# Altium PCB CM5IO_V2.PcbDoc (part 2 of 4)
Units mm, origin at the board's own origin, x right, y up, seen from the top; angles counter-clockwise.
Board outline 160 x 90 mm, 4 copper layers (F.Cu, In1.Cu, In2.Cu, B.Cu); 77 components, 161 nets, 674 pads, 703 vias.
Unrouted connection lines stored in the file: 47.
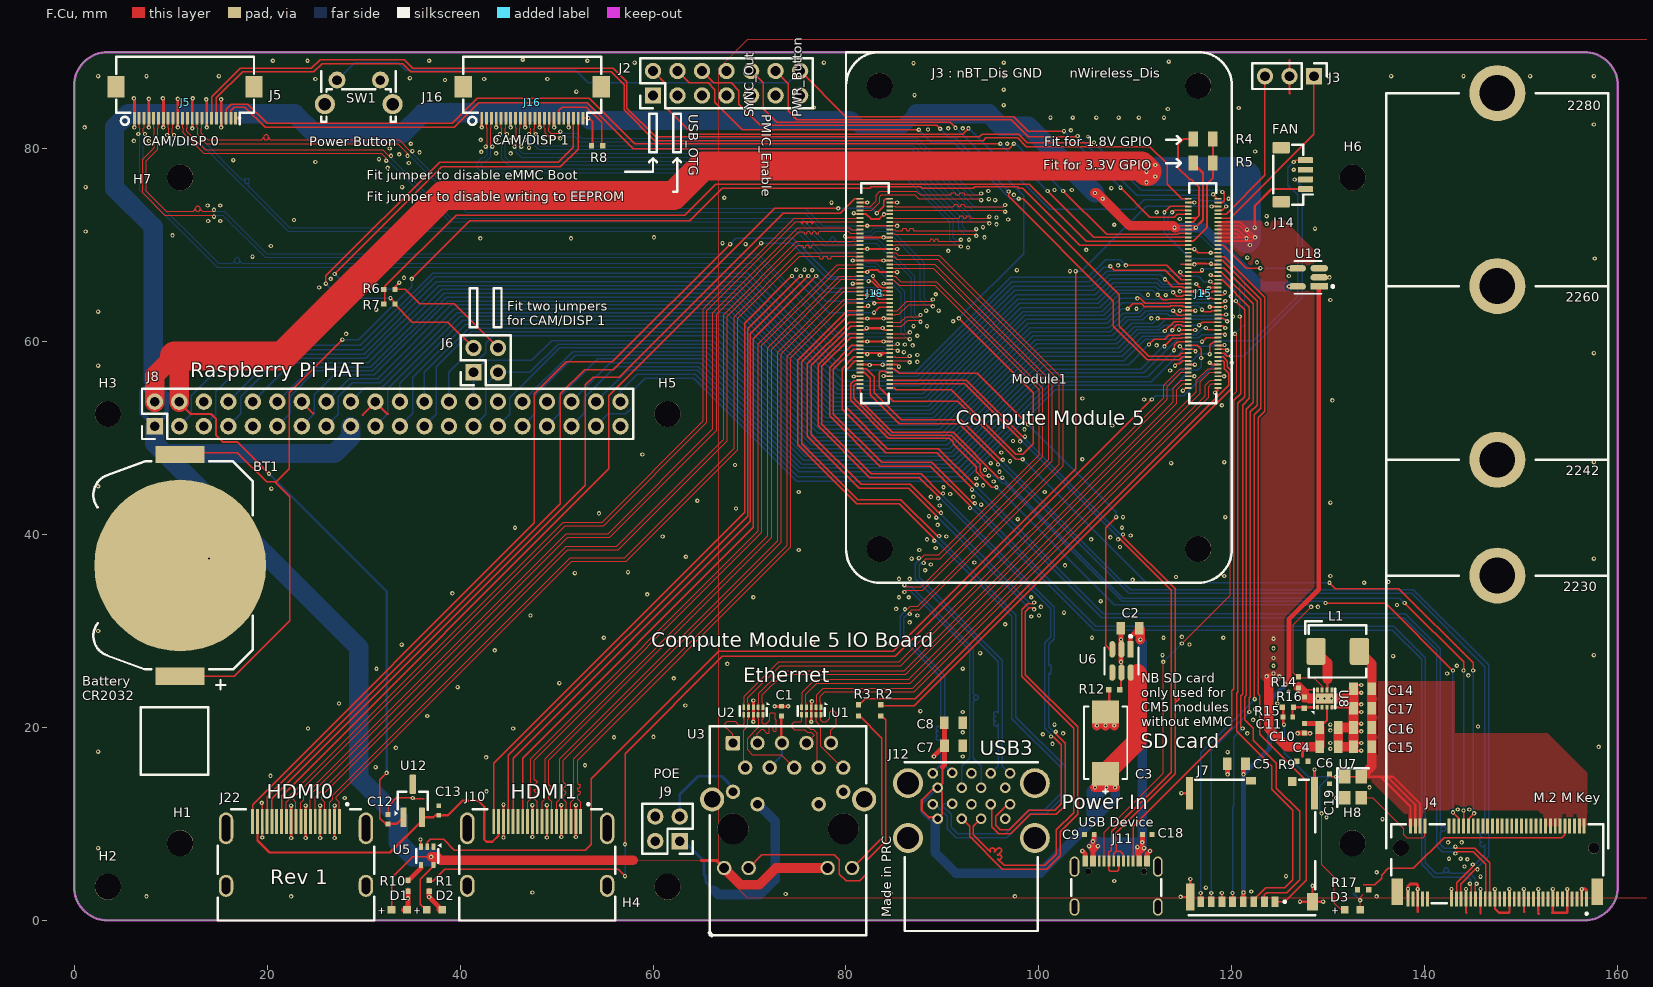
[diagram p0: F.Cu view]

## Part data (continued)
U1 U2: library part CMP-02720-1, "TEXAS INSTRUMENTS         TPD4EUSB30DQAR             ESD Protection Device, Array, 8 V, SON, 10 Pins", Breakdown Voltage=7V, Capacitance=0.8pF, Clamping Voltage=8V, Current Rating=5A, Max Operating Temperature=85°C, Min Operating Temperature=-40°C, Package Quantity=1, Peak Pulse Current=1A, Peak Pulse Power=45W, Power Line Protection=Yes, Reverse Standoff Voltage=5.5V, Data Rate=6Gbps, Depth=1mm, Direction=Unidirectional, ES P/N=0086-0901-1, ESD Protection=Yes, Height=0.5mm, Interface=USB, Lead Free="Lead Free", Length=2.5mm, Min Breakdown Voltage=8V, Number of Bidirectional Channels=4, Number Of Channels=4, Number of Pins=10, Packaging="Tape and Reel", Radiation Hardening=No, REACH SVHC="No SVHC", RoHS Compliant=Yes, SM P/N=6949-44043002, Termination=SMD/SMT, Width=1.1mm, Working Voltage=5.5V
U3: library part CMP-002-00168-2, "TRJG0926HENL Single Port Ethernet(PoE+) RJ45 Female Connector with 10/100/1000 Base-T Integrated Magnetics, Green/Yellow LED, Tab Down, RoHS", ComponentLink1Description=https://www.l-p.com/sale-432379-link-pp-lpjg0926henl-cross-a70-112-331n126-edac.htm, ComponentLink1URL=https://www.l-p.com/upload/file/2019/11-26/002050785.pdf, ComponentLink2Description=TRXCOM, ComponentLink2URL=https://p.globalsources.com/IMAGES/PDT/SPEC/690/K1160305690.pdf, EDAC P/N=A70-112-331N126, TE P/N=5-2337992-8
U5: library part CMP-633-000142-2, "74LVC Series 5.5 V Surface Mount Single Buffer with Open Drain Output - SOT-353", Case/Package=SOT-353, Low Level Output Current=32mA, Max Operating Temperature=85°C, Max Supply Voltage=5.5V, Min Operating Temperature=-40°C, Min Supply Voltage=1.65V, Operating Supply Current=10uA, Package Quantity=3000, Quiescent Current=200uA, Height=1mm, Lead Free="Lead Free", Length=2.2mm, Logic Function=Buffer,Inverting, Mounting Technology="Surface Mount", Number of Bits per Element=1, Number Of Channels=1, Number of Elements=1, Number of Gates=1, Number of Input Lines=1, Number Of Inputs=1, Number of Output Lines=1, Number Of Outputs=1, Packaging="Tape and Reel", Pins=5, Polarity=Inverting,Non-Inverting, Propagation Delay=3ns, Radiation Hardening=No, Reach SVHC Compliant=No, RoHS Compliant=Yes, Series=74LVC, Technology=CMOS, Turn-On Delay Time=8.5ns, Width=1.35mm
U6: library part CMP-000465-1, "USB Power High Side Switch Single 3V to 5.5V 2.1A 6-Pin SOT-26 T/R", Case/Package=SOT-23-6, Max Operating Temperature=85°C, Max Output current=2.1A, Max Supply Voltage=5.5V, Min Operating Temperature=-40°C, Min Supply Voltage=3V, Fault Protection="Over Voltage,Over Temperature,Short Circuit,Reverse Current", Height=1.4mm, Interface=On/Off, Mounting Technology="Surface Mount", Number Of Channels=1, Number Of Outputs=1, Output Configuration="High Side", Output Current=2.1A, Series=-
U7: library part CMP-003-00021-1, "Oscillator XO 0.032768MHz ±25ppm 15pF 60% 3.3V 4-Pin SMD T/R"
U8: library part CMP-000466-1, "Dc/dc Conv, Buck, 1Mhz, -40 To 85Deg C Rohs Compliant: Yes", RoHS Compliant=Yes
U12: library part CMP-000463-1, "IC Pwr Switch N-chan 1: 1 SOT23-3", Case/Package=SOT-23-3, Max Operating Temperature=85°C, Max Output current=500mA, Min Operating Temperature=-40°C, Fault Protection="Over Temperature,Reverse Current", Interface=On/Off, Mounting Technology="Surface Mount", Number Of Outputs=1, Output Configuration="High Side", Packaging="Cut Tape", RoHS Compliant=Yes, Series=-
U18: library part CMP-000462-2, "IC Pwr Swtch N-chan 1: 1 TSOT23-5", Case/Package=SOT-23-5, Max Operating Temperature=85°C, Max Output current=1A, Min Operating Temperature=-40°C, On-State Resistance=70mR, Fault Protection="Over Temperature,Reverse Current", Interface=On/Off, Number Of Outputs=1, Output Configuration="High Side", Packaging="Cut Tape", Pins=23, Reach SVHC Compliant=No, RoHS Compliant=Yes, Series=-

## Via types
v1: diameter 0.45, hole 0.2, F.Cu to B.Cu, tented both sides, 703 vias

## Nets (pads, with @x,y where several pads share a name; then routed paths per layer and width w, separated by ;. In a path a pad name is that pad's centre, name@x,y a point inside that pad or via, vN(x,y) a via of type N, cw(c..) or ccw(c..) an arc to the next point about the centre after c; other vN are vias at no path point)
+1.8v: Module1.88 Module1.90 R4.1 | length 12.6
  F.Cu w0.2: Module1.88@115.42,72.4 116,72.4 116.3,72.7 116.3,72.8 ; Module1.90@115.42,72.8 116.3,72.8 ; R4.1@115.975,81 115,81 114.4,80.4 114.4,78 115.6,76.8 115.8,76.8 116.6,76 116.6,73.1 116.3,72.8
+3.3v: D1.2 D2.2 J5.22 J8.1 J8.17 J16.22 Module1.84 Module1.86 R5.1 R8.1 U3.15 U3.17 U5.5 U18.5 | length 325.1
  F.Cu w0.127: 57.95,6.25 65,6.2
  F.Cu w0.13: D1.2@33.25,1.1 32.912,1.438 32.912,4.413 35.1,6.6 v1(37,6.6) ; D2.2@36.9,1.1 36.5,1.1 35.9,1.7 35.9,4.3 U5.5@37.107,5.507
  F.Cu w0.2: J16.22@52.75,83.15 v1(53.3,83.15) 53.35,83.15 53.73,82.77 R8.1@53.73,80.3 ; v1@114.1,71.7 114.1,71.8 114.3,72 Module1.86@115.46,72 116.1,72 116.25,71.85 116.3,71.8 116.275,71.775 116.1,71.6 Module1.84@115.46,71.6 114.2,71.6 v1@114.1,71.7
  F.Cu w0.23: R5.1@115.975,78.5 117,77.475 117,72.6 116.25,71.85 v1(116.25,71.8)
  F.Cu w0.3: J5.22@16.75,83.15 v1(17.15,83.15) ; 65,6.2 66.61,6.2 U3.15@67.37,5.44
  F.Cu w0.5: U5.5@37.25,5.75 37.25,6.195 ; v1(125.9,65.7) U18.5@126.8,65.7
  F.Cu w1: v1(37,6.6) 37.6,6.6 37.95,6.25 57.95,6.25 ; U3.15@67.37,5.44 69.11,3.7 71,3.7 72.74,5.44 U3.17@78.09,5.44 ; v1(105.8,75.4) 106,75.4 v1(106.6,74.8) 109.4,72 113.9,72 v1@114.1,71.8
  B.Cu w0.5: 7,52.55 7,54.8 8.2,56 9.6,54.6 9.6,52.41 8.37,51.18 7,52.55
  B.Cu w1: v1@114.1,71.8 v1(116.25,71.8) 117,71.8 123.1,65.7 v1(125.9,65.7)
  B.Cu w1.5: 80.6,83.1 81.4,82.3 85.9,82.3 87.2,83.6
  B.Cu w2: 8.2,56 8.2,71.9 4.2,75.9 4.2,82.2 5.595,83.595 22.868,83.595 24.863,81.6 34.1,81.6 36.2,83.7 52.75,83.7 v1(53.3,83.15) 53.55,82.9 80.4,82.9 ; J8.1@8.37,51.18 8.37,49.43 9.4,48.4 ; J8.17@28.69,51.18 28.69,50.09 27,48.4 9.4,48.4 ; v1(37,6.6) 35.1,6.6 33.6,8.1 33.6,10.7 29.5,14.8 29.5,28.3 9.4,48.4 ; 87.3,83.6 94.8,83.6 96.1,82.3 98.9,82.3 v1(105.8,75.4)
  other v1: 114.05,71.8
+5v: C2.2 C4.2 C6.2 C9.2 C10.2 C12.2 C18.2 J8.2 J8.4 J11.A4 J11.A9 J11.B4 J11.B9 J14.1 Module1.77 Module1.79 Module1.81 Module1.83 Module1.85 Module1.87 R9.2 U6.1 U8.3 U12.1 | length 290.5
  F.Cu w0.13: 32.285,10.015 31.7,10.6 31.7,14.6 v1(32.4,15.3) ; C12.2@32.55,10.985 32.55,11.85 33.4,12.7 v1(35.1,12.7) 35.2,12.6 36.285,12.6
  F.Cu w0.2: Module1.77@118.5,70.4 122,70.4 v1(122.4,70.8) ; Module1.79@118.5,70.8 121.6,70.8 v1(122.4,70.8) ; Module1.81@118.5,71.2 120.5,71.2 120.9,70.8 ; Module1.83@118.5,71.6 120.6,71.6 v1@121.4,70.8 ; Module1.85@118.5,72 120.8,72 122,70.8 ; Module1.87@118.5,72.4 120.8,72.4 v1(122.4,70.8)
  F.Cu w0.23: J8.4@10.91,53.67 12.08,52.5 14.2,52.5 14.7,52 14.7,50.3 15.4,49.6 16.9,49.6 v1(20.2,46.3) ; 32.285,10.015 32.55,10.015 33.475,10.015 U12.1@34.15,10.69 ; v1(122.35,71.8) 122.35,74.05 124.1,75.8 J14.1@127.625,75.8 ; 129.1,20 129.85,20.75 U8.3@129.85,22.1
  F.Cu w0.3: 127.3,17.01 127.3,18
  F.Cu w0.5: v1(105.2,7.7) 105.6,7.3 ; C9.2@105.7,8.9 105.7,8.3 v1(105.6,8.2) 105.6,7.3 ; v1(106.1,7.7) 105.6,7.2 J11.B9@105.6,6.155 105.6,7.3 ; U6.1@109.45,27.875 109.45,29.375 C2.2@110.375,30.3 ; v1(110.2,7.6) 110.2,6.93 110.4,6.73 J11.B4@110.4,6.155 110.4,7 ; C18.2@110.74,8.9 110.74,8.14 v1(110.7,8.1) 110.7,7.3 110.4,7 ; v1(110.9,7.5) 110.4,7 ; v1(126.8,19.4) 126.83,19.43 C10.2@127.5,19.43 ; 127.5,20.4 128.7,20.4 129.1,20 ; C10.2@127.53,19.4 v1(128.1,19.4)
  F.Cu w1: C2.2@110.375,30.3 110.5,30.175 v1(110.5,29.1) ; 123.8,25.1 123.8,19.9 125.7,18 127.3,18 129.1,18 129.1,20
  F.Cu w2: J8.2@8.37,53.72 8.37,56.47 10.4,58.5 10.91,57.99 J8.4@10.91,53.72
  F.Cu w3: 10.4,58.5 21.6,58.5 38.241,75.141 62.141,75.141 65.2,78.2 110.6,78.2 v1@111.2,77.6
  B.Cu w0.23: v1(20.2,46.3) 32.4,34.1 v1(32.4,15.3)
  B.Cu w0.5: v1(105.2,7.7) v1(106.1,7.7) ; v1(110.7,8.1) 110.9,7.9 v1(110.9,7.5)
  B.Cu w1: v1(110.5,29.1) 110.7,28.9 v1(110.7,8.1)
  B.Cu w2: v1(106.1,7.7) 106.2,7.6 v1(110.2,7.6)
  B.Cu w3: v1@111.2,77.6 121,77.6 121.5,77.1 v1(121.5,70.7)
  other v1: 124.3,24.9 123.6,25.3 124.9,25.3 124.3,25.6 124.3,27.2 124.3,29.2 121.85,70 121.55,71.6 111.15,76.5 112.05,77.1 111.15,77.6 112.05,78.3 111.15,78.7
BT_nDis: J3.3 Module1.91 | length 16.9
  F.Cu w0.13: Module1.91@118.5,73.2 119.4,73.2 123.42,77.22 J3.3@123.42,87.5
CAM_GPIO0: J5.17 Module1.97 | length 117.8
  F.Cu w0.13: J5.17@14.25,83.15 14.25,85.35 17.2,88.3 24.6,88.3 25.5,89.2 34.2,89.2 35.1,88.3 55.9,88.3 57.3,86.9 57.3,84.2 60.3,81.2 93.8,81.2 94.1,81.5 97.9,81.5 98.78,80.62 v1(105.7,80.62) ; Module1.97@118.5,74.4 119,74.4 119.2,74.6 119.2,75.3 v1(119,75.5)
  B.Cu w0.13: v1(105.7,80.62) 110.62,75.7 118.8,75.7 v1(119,75.5)
CAM_GPIO1: J5.18 Module1.100 | length 113.1
  F.Cu w0.13: J5.18@14.75,83.15 14.75,85.25 17.466,87.966 24.866,87.966 25.7,88.8 34.066,88.8 34.9,87.966 55.666,87.966 57,86.632 57,84 60.2,80.8 94.2,80.8 94.5,81.1 97.8,81.1 98.7,80.2 111.5,80.2 113.3,78.4 113.3,76.3 114.8,74.8 Module1.100@115.42,74.8
CC1: J11.A5 Module1.94 | length 80.3
  F.Cu w0.127: J11.A5@106.75,6.155 106.75,9.15 112.875,15.275 v1(112.875,26.8) ; v1(113.8,73.4) 114,73.6 ; v1(114.8,28.7) 119.8,33.7 119.8,54.156 120.5,54.856 120.5,60.6 v1(120.3,60.8)
  F.Cu w0.13: 114,73.6 Module1.94@115.42,73.6
  B.Cu w0.127: v1(112.875,26.8) 114.775,28.7 v1(114.8,28.7) ; v1(113.8,73.4) 113.407,73.007 113.407,71.394 113.9,70.9 116.8,70.9 121.3,66.4 121.3,61.8 v1(120.3,60.8)